# Altium PCB photo_frame-v1.0.PcbDoc (part 4 of 5)
Units mil, origin at the board's own origin, x right, y up, seen from the top; angles counter-clockwise.
Board outline 27716.54 x 14566.93 mil, 2 copper layers (Top Layer, Bottom Layer), stack 61.811 mil thick; 261 components, 231 nets, 1061 pads, 959 vias.
Unrouted connection lines stored in the file: 10.
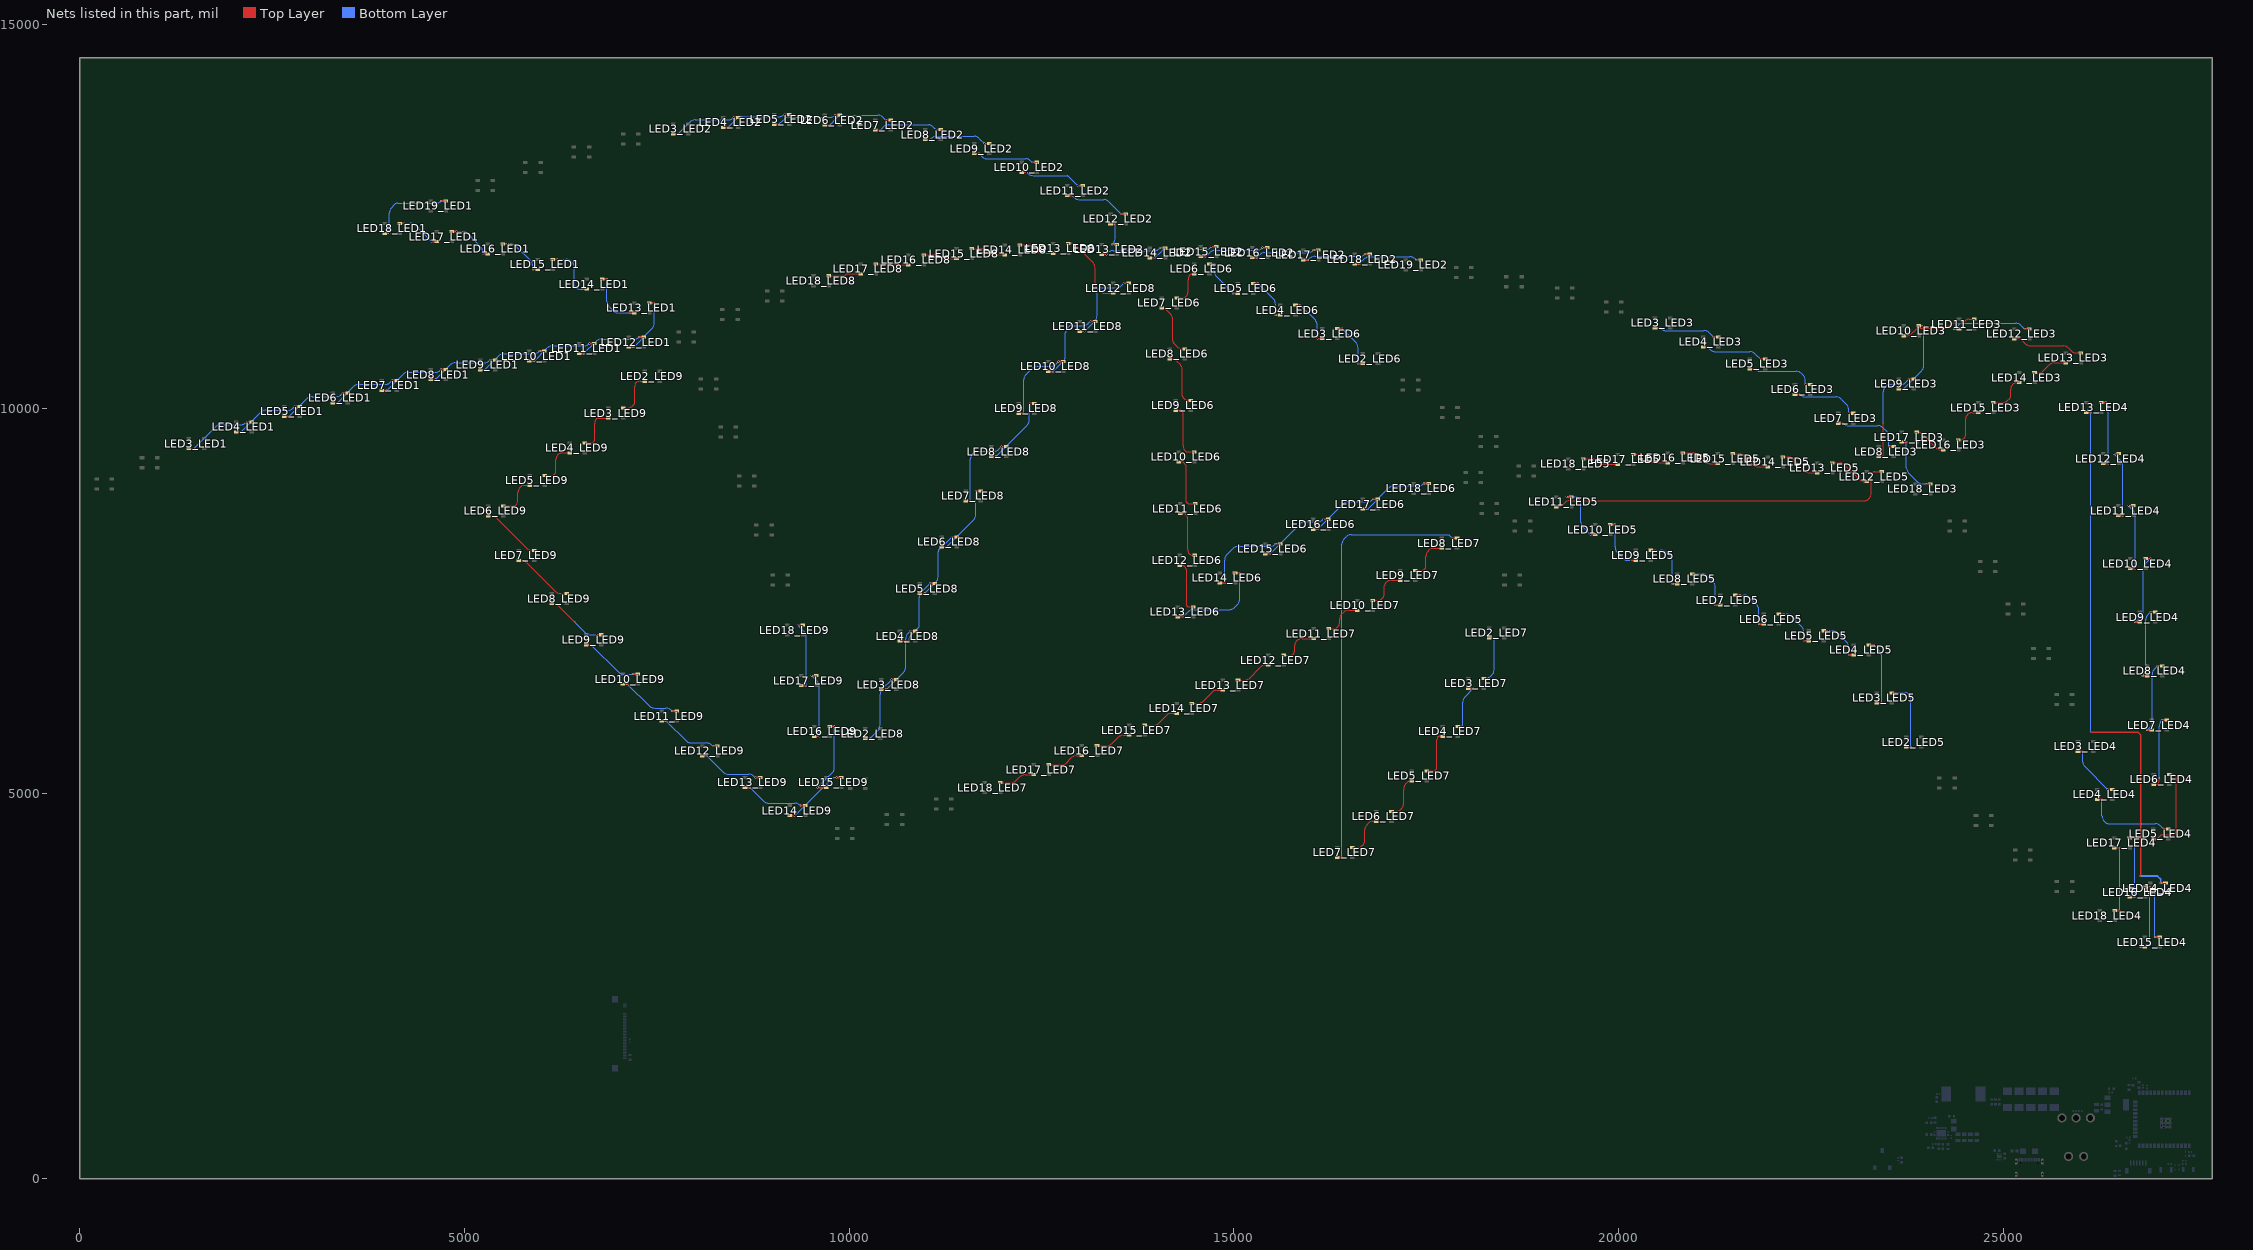
[diagram p3: the nets of this part, all layers, seen from the top]

## Via types
v1: diameter 23.62, hole 11.81, Top Layer to Bottom Layer, tented both sides, 729 vias
v2: diameter 23.62, hole 11.81, Top Layer to Bottom Layer, 230 vias

## Nets (pads, with @x,y where several pads share a name; then routed paths per layer and width w, separated by ;. In a path a pad name is that pad's centre, name@x,y a point inside that pad or via, vN(x,y) a via of type N, cw(c..) or ccw(c..) an arc to the next point about the centre after c; other vN are vias at no path point) (continued)
DOUT2_LED5: LED2_LED5.2 LED3_LED5.4 | length 986.1
  Top Layer w22: LED3_LED5.4@23550.54,6311.22 v1@23613.36,6311.22 ; LED2_LED5.2@23734.69,5606.3 v1@23797.51,5606.3
  Bottom Layer w12: v1(23613.36,6311.35) 23614.27,6312.26 23722.43,6312.26 cw(c23722.43,6229.43) 23729.41,6311.97 cw(c23722.43,6229.43) 23781,6288 cw(c23741.13,6248.13) 23797.51,6248.13 v1(23797.51,5606.43)
DOUT2_LED6: LED2_LED6.2 LED3_LED6.4 | length 662.5
  Top Layer w22: LED3_LED6.4@16343.84,11043.67 v1@16406.66,11043.67 ; v1@16613.2,10588.1 LED2_LED6.2@16676.02,10588.1
  Bottom Layer w12: v1(16406.66,11043.8) 16583.91,10866.56 cw(c16513.2,10795.85) 16613.2,10795.85 v1(16613.2,10588.23)
DOUT2_LED7: LED2_LED7.2 LED3_LED7.4 | length 678.7
  Top Layer w22: LED3_LED7.4@18245.54,6499.22 v1@18308.36,6499.22 ; LED2_LED7.2@18318.69,7026.3 v1@18381.51,7026.3
  Bottom Layer w12: v1(18308.36,6499.09) 18352.22,6542.95 ccw(c18281.51,6613.66) 18381.51,6613.66 v1(18381.51,7026.17)
DOUT2_LED8: LED2_LED8.2 LED3_LED8.4 | length 1001
  Top Layer w22: LED2_LED8.2@10208.69,5716.3 v1@10271.51,5716.3 ; v1@10551.72,6484.22 LED3_LED8.4@10614.54,6484.22
  Bottom Layer w12: v1(10271.51,5716.17) 10372.83,5817.48 ccw(c10302.12,5888.19) 10402.12,5888.19 10402.12,6293.06 cw(c10502.12,6293.06) 10431.41,6363.77 v1(10551.72,6484.09)
DOUT2_LED9: LED2_LED9.2 LED3_LED9.4 | length 558.1
  Top Layer w12: LED3_LED9.4@7066.54,10011.22 7116.8,10011.22 ccw(c7116.8,10111.22) 7142.42,10014.56 ccw(c7116.8,10111.22) 7187.51,10040.51 7201,10054 ccw(c7172.03,10082.97) 7213,10082.97 7213,10287.88 cw(c7313,10287.88) 7222.28,10329.94 7230.28,10337.94 cw(c7284.25,10283.97) 7284.25,10360.3 LED2_LED9.2@7342.69,10360.3
DOUT3_LED1: LED3_LED1.2 LED4_LED1.4 | length 951.9
  Top Layer w22: LED3_LED1.2@1420.08,9484.22 v1@1482.9,9484.22 ; v1@2172.72,9833.22 LED4_LED1.4@2235.54,9833.22
  Bottom Layer w12: v1(1482.9,9484.09) 1764.52,9765.71 cw(c1835.23,9695) 1835.23,9795 2093.21,9795 ccw(c2093.21,9895) 2163.93,9824.29 v1(2172.72,9833.09)
  Bottom Layer w22: v1@1482.08,9484.22 v1@1482.42,9484.56
DOUT3_LED2: LED3_LED2.2 LED4_LED2.4 | length 929.3
  Top Layer w22: LED3_LED2.2@7713.69,13573.3 v1@7776.51,13573.3 ; v1@8499.72,13788.22 LED4_LED2.4@8562.54,13788.22
  Bottom Layer w12: v1(7776.51,13573.17) 7930.32,13726.97 cw(c8001.03,13656.26) 8001.03,13756.26 8426.47,13756.26 ccw(c8426.47,13856.26) 8497.19,13785.55 v1(8499.72,13788.09)
DOUT3_LED3: LED3_LED3.2 LED4_LED3.4 | length 860.7
  Top Layer w22: LED3_LED3.2@20472.69,11053.3 v1@20535.51,11053.3 ; v1@21230.72,10936.22 LED4_LED3.4@21293.54,10936.22
  Bottom Layer w12: v1(20535.51,11053.43) 20540.66,11048.29 ccw(c20611.37,11119) 20611.37,11019 21106.66,11019 cw(c21106.66,10919) 21177.37,10989.71 v1(21230.72,10936.35)
DOUT3_LED4: LED3_LED4.2 LED4_LED4.4 | length 746.9
  Top Layer w22: LED3_LED4.2@25969.05,5550.32 v1@26031.87,5550.32 ; v1@26352.17,5057.42 LED4_LED4.4@26414.99,5057.42
  Bottom Layer w12: v1(26031.87,5550.19) 26031.87,5419 ccw(c26131.87,5419) 26061.16,5348.29 v1(26352.17,5057.28)
DOUT3_LED5: LED3_LED5.2 LED4_LED5.4 | length 917.4
  Top Layer w22: LED4_LED5.4@23249.54,6934.22 v1@23312.36,6934.22 ; LED3_LED5.2@23353.69,6181.3 v1@23416.51,6181.3
  Bottom Layer w12: v1(23312.36,6934.35) 23387.22,6859.49 cw(c23316.51,6788.78) 23416.51,6788.78 v1(23416.51,6181.43)
DOUT3_LED6: LED3_LED6.2 LED4_LED6.4 | length 648.4
  Top Layer w22: LED4_LED6.4@15800.85,11349.47 v1@15863.67,11349.47 ; v1@16084.17,10913.75 LED3_LED6.2@16146.99,10913.75
  Bottom Layer w12: v1(15863.67,11349.6) 16054.88,11158.39 cw(c15984.17,11087.68) 16084.17,11087.68 v1(16084.17,10913.88)
DOUT3_LED7: LED3_LED7.2 LED4_LED7.4 | length 671.2
  Top Layer w22: LED4_LED7.4@17911.54,5876.22 v1@17974.36,5876.22 ; LED3_LED7.2@18048.69,6369.3 v1@18111.51,6369.3
  Bottom Layer w12: v1(17974.36,5876.09) 17974.36,6190.59 cw(c18074.36,6190.59) 18003.65,6261.31 v1(18111.51,6369.17)
DOUT3_LED8: LED3_LED8.2 LED4_LED8.4 | length 1006.8
  Top Layer w22: LED3_LED8.2@10417.69,6354.3 v1@10480.51,6354.3 ; v1@10795.72,7113.22 LED4_LED8.4@10858.54,7113.22
  Bottom Layer w12: v1(10480.51,6354.17) 10707.71,6581.36 ccw(c10637,6652.07) 10725.51,6605.54 ccw(c10637,6652.07) 10737,6652.07 10737,7013.21 cw(c10837,7013.21) 10763.28,7080.78 cw(c10837,7013.21) 10766.29,7083.92 v1(10795.72,7113.35)
DOUT3_LED9: LED3_LED9.2 LED4_LED9.4 | length 582.8
  Top Layer w12: LED4_LED9.4@6565.54,9559.22 6651.56,9559.22 ccw(c6651.56,9599.44) 6680,9571 ccw(c6648.62,9602.38) 6693,9602.38 6693,9808.72 cw(c6793,9808.72) 6711.69,9866.94 cw(c6746.37,9832.26) 6746.37,9881.3 LED3_LED9.2@6869.69,9881.3
DOUT4_LED1: LED4_LED1.2 LED5_LED1.4 | length 949.4
  Top Layer w22: LED4_LED1.2@2038.69,9703.3 v1@2101.51,9703.3 ; v1@2796.72,10034.22 LED5_LED1.4@2859.54,10034.22
  Bottom Layer w12: v1(2101.51,9703.17) 2353.32,9954.97 cw(c2424.03,9884.26) 2424.03,9984.26 2705.47,9984.26 ccw(c2705.47,10084.26) 2773.05,10010.54 ccw(c2705.47,10084.26) 2776.19,10013.55 v1(2796.72,10034.09)
  Bottom Layer w22: v1@2796.66,10034.15 v1@2796.72,10034.22
DOUT4_LED2: LED4_LED2.2 LED5_LED2.4 | length 918.2
  Top Layer w22: LED4_LED2.2@8365.69,13658.3 v1@8428.51,13658.3 ; v1@9158.72,13829.22 LED5_LED2.4@9221.54,13829.22
  Bottom Layer w12: v1(8428.51,13658.17) 8539.32,13768.97 cw(c8610.03,13698.26) 8610.03,13798.26 9086.21,13798.26 ccw(c9086.21,13898.26) 9156.92,13827.55 v1(9158.72,13829.35)
DOUT4_LED3: LED4_LED3.2 LED5_LED3.4 | length 861.5
  Top Layer w22: LED4_LED3.2@21096.69,10806.3 v1@21159.51,10806.3 ; v1@21839.72,10651.22 LED5_LED3.4@21902.54,10651.22
  Bottom Layer w12: v1(21159.51,10806.43) 21193.66,10772.29 ; 21193.69,10772.26 ccw(c21264.37,10843) 21264.37,10743 21706.66,10743 cw(c21706.66,10643) 21777.37,10713.71 v1(21839.72,10651.35)
DOUT4_LED4: LED4_LED4.2 LED5_LED4.4 | length 1222
  Top Layer w22: LED4_LED4.2@26218.14,4927.49 v1@26280.96,4927.49 ; v1@27080.99,4544.3 LED5_LED4.4@27143.81,4544.3
  Bottom Layer w12: v1(26280.96,4927.36) 26280.96,4714.47 ccw(c26380.96,4714.47) 26310.25,4643.75 26325,4629 ccw(c26370.87,4674.87) 26370.87,4610 26973.74,4610 cw(c26973.74,4510) 27044.45,4580.71 v1(27080.99,4544.17)
DOUT4_LED5: LED4_LED5.2 LED5_LED5.4 | length 593.7
  Top Layer w22: LED5_LED5.4@22664.54,7118.22 v1@22727.36,7118.22 ; v1@22989.87,6804.3 LED4_LED5.2@23052.69,6804.3
  Bottom Layer w12: v1(22727.36,7118.35) 22778.22,7118.35 cw(c22778.22,7018.35) 22848.94,7089.06 22960.58,6977.42 cw(c22889.87,6906.71) 22989.87,6906.71 v1(22989.87,6804.43)
DOUT4_LED6: LED4_LED6.2 LED5_LED6.4 | length 628.9
  Top Layer w22: LED5_LED6.4@15249.93,11632.48 v1@15312.75,11632.48 ; v1@15541.18,11219.55 LED4_LED6.2@15604,11219.55
  Bottom Layer w12: v1(15312.75,11632.62) 15511.89,11433.48 cw(c15441.18,11362.77) 15541.18,11362.77 v1(15541.18,11219.68)
DOUT4_LED7: LED4_LED7.2 LED5_LED7.4 | length 621.7
  Top Layer w12: LED5_LED7.4@17508.54,5298.22 17606.88,5298.22 ccw(c17606.88,5311.12) 17616,5302 17619.62,5305.62 ccw(c17575.23,5350) 17638,5350 17638,5702.84 cw(c17699.46,5702.84) 17647.15,5735.11 ; 17646,5734 cw(c17675.69,5704.31) 17647.15,5735.11 ; LED4_LED7.2@17714.69,5746.3 17675.69,5746.3 ccw(c17675.69,5704.31) 17647.15,5735.11
DOUT4_LED8: LED4_LED8.2 LED5_LED8.4 | length 1028.5
  Top Layer w22: LED4_LED8.2@10661.69,6983.3 v1(10773.12,6983.26) ; v1@11050.72,7731.22 LED5_LED8.4@11113.54,7731.22
  Bottom Layer w12: v1(10773.12,6983.26) 10773.12,6986.37 cw(c10873.12,6986.37) 10802.41,7057.08 10912.66,7167.34 10912.66,7551.6 cw(c11012.66,7551.6) 10922.36,7594.57 cw(c11012.66,7551.6) 10941.95,7622.31 v1(11050.72,7731.09)
DOUT4_LED9: LED4_LED9.2 LED5_LED9.4 | length 552.2
  Top Layer w12: LED5_LED9.4@6045.54,9137.22 6127.25,9137.22 ccw(c6127.25,9204.75) 6175,9157 ccw(c6138.79,9193.21) 6190,9193.21 6190,9342.64 cw(c6275.36,9342.64) 6215,9403 cw(c6278.49,9339.51) 6278.49,9429.3 LED4_LED9.2@6368.69,9429.3
DOUT5_LED1: LED5_LED1.2 LED6_LED1.4 | length 942.1
  Top Layer w22: LED5_LED1.2@2662.69,9904.3 v1@2725.51,9904.3 ; v1@3423.72,10210.22 LED6_LED1.4@3486.54,10210.22
  Bottom Layer w12: v1(2725.51,9904.17) 2952.32,10130.97 cw(c3023.03,10060.26) 3023.03,10160.26 3332.47,10160.26 ccw(c3332.47,10260.26) 3400.05,10186.54 ccw(c3332.47,10260.26) 3403.19,10189.55 v1(3423.72,10210.09)
  Bottom Layer w22: v1@3423.66,10210.15 v1@3423.72,10210.22
DOUT5_LED2: LED5_LED2.2 LED6_LED2.4 | length 896.6
  Top Layer w22: LED5_LED2.2@9024.69,13699.3 v1@9087.51,13699.3 ; v1@9816.72,13818.22 LED6_LED2.4@9879.54,13818.22
  Bottom Layer w12: v1(9087.51,13699.17) 9149.32,13760.97 cw(c9220.03,13690.26) 9220.03,13790.26 9757,13790.26 ccw(c9757,13866.62) v1@9810.96,13812.6 ; v1@9810.99,13812.62 v1(9816.72,13818.35)
DOUT5_LED3: LED5_LED3.2 LED6_LED3.4 | length 906.7
  Top Layer w22: LED5_LED3.2@21705.69,10521.3 v1@21768.51,10521.3 ; v1@22425.79,10320.59 LED6_LED3.4@22488.61,10320.59
  Bottom Layer w12: v1(21768.51,10521.43) 21772.4,10517.55 ccw(c21843.11,10588.26) 21843.11,10488.26 22307.32,10488.26 cw(c22307.32,10388.26) 22378.03,10458.97 22400,10437 cw(c22337.73,10374.73) 22425.79,10374.73 v1(22425.79,10320.73)
DOUT5_LED4: LED5_LED4.2 LED6_LED4.4 | length 1147.8
  Top Layer w12: LED5_LED4.2@26946.96,4414.38 26983,4414.38 ccw(c26983,4456) 27012.43,4426.57 27039.32,4453.46 ; 27039.35,4453.49 cw(c27072,4420.79) 27072,4467 27191.37,4467 ccw(c27191.37,4521.63) 27230,4483 ccw(c27188.96,4524.04) 27245.84,4512.52 ccw(c27188.96,4524.04) 27247,4524.04 27247,5199.62 ccw(c27202.62,5199.62) 27234,5231 ccw(c27184.11,5181.11) 27196.88,5250.5 ccw(c27184.11,5181.11) 27184.11,5251.67 LED6_LED4.4@27153.06,5251.67
DOUT5_LED5: LED5_LED5.2 LED6_LED5.4 | length 613.4
  Top Layer w22: LED6_LED5.4@22081.97,7334.26 v1@22144.79,7334.26 ; v1@22404.87,6988.3 LED5_LED5.2@22467.69,6988.3
  Bottom Layer w12: v1(22144.79,7334.39) 22176.19,7334.39 cw(c22176.19,7234.39) 22246.9,7305.1 22375.58,7176.42 cw(c22304.87,7105.71) 22404.87,7105.71 v1(22404.87,6988.43)
DOUT5_LED6: LED5_LED6.2 LED6_LED6.4 | length 604.1
  Top Layer w22: LED6_LED6.4@14683.67,11884.4 v1@14746.49,11884.4 ; v1@14990.26,11502.56 LED5_LED6.2@15053.08,11502.56
  Bottom Layer w12: v1(14746.49,11884.53) 14746.49,11787.89 ccw(c14846.49,11787.89) 14775.78,11717.18 v1(14990.26,11502.69)
DOUT5_LED7: LED5_LED7.2 LED6_LED7.4 | length 566.6
  Top Layer w12: LED6_LED7.4@17048.54,4772.22 17102.8,4772.22 ccw(c17102.8,4872.22) 17107.17,4772.32 ccw(c17102.8,4872.22) 17173.51,4801.51 17176.71,4804.71 ccw(c17106,4875.42) 17206,4875.42 17206,5061.82 cw(c17298.18,5061.82) 17233,5127 17247.86,5141.86 cw(c17311.69,5078.02) LED5_LED7.2@17311.69,5168.3
DOUT5_LED8: LED5_LED8.2 LED6_LED8.4 | length 1006.1
  Top Layer w22: LED5_LED8.2@10916.69,7601.3 v1@10979.51,7601.3 ; v1@11337.72,8339.22 LED6_LED8.4@11400.54,8339.22
  Bottom Layer w12: v1(10979.51,7601.43) 11127.83,7749.75 ccw(c11057.12,7820.46) 11157.12,7820.46 11157.12,8144 cw(c11192.73,8144) 11165.78,8167.28 cw(c11192.73,8144) 11167.54,8169.17 ; 11167.55,8169.18 v1(11337.72,8339.35)
DOUT5_LED9: LED5_LED9.2 LED6_LED9.4 | length 543.9
  Top Layer w12: LED6_LED9.4@5505.54,8740.22 5645.8,8740.22 ccw(c5645.8,8770.2) 5667,8749 5667.71,8749.71 ccw(c5597,8820.42) 5697,8820.42 5697,8911.88 cw(c5797,8911.88) 5726.29,8982.59 5736.86,8993.16 cw(c5771,8959.01) 5771,9007.3 LED5_LED9.2@5848.69,9007.3
DOUT6_LED1: LED6_LED1.2 LED7_LED1.4 | length 947.2
  Top Layer w22: LED6_LED1.2@3289.69,10080.3 v1@3352.51,10080.3 ; v1@4061.72,10370.22 LED7_LED1.4@4124.54,10370.22
  Bottom Layer w12: v1(3352.51,10080.17) 3565.32,10292.97 cw(c3636.03,10222.26) 3636.03,10322.26 3979,10322.26 ccw(c3979,10405.86) 4038.12,10346.75 v1(4061.72,10370.35)
DOUT6_LED2: LED6_LED2.2 LED7_LED2.4 | length 927.7
  Top Layer w22: LED6_LED2.2@9682.69,13688.3 v1@9745.51,13688.3 ; v1@10475.72,13753.22 LED7_LED2.4@10538.54,13753.22
  Bottom Layer w12: v1(9745.51,13688.43) 9845.79,13788.71 cw(c9916.5,13718) 9853.01,13795.26 cw(c9916.5,13718) 9916.5,13818 10369.66,13818 cw(c10369.66,13718) 10433.15,13795.26 cw(c10369.66,13718) 10440.37,13788.71 v1(10475.72,13753.35)
DOUT6_LED3: LED6_LED3.2 LED7_LED3.4 | length 901.3
  Top Layer w22: LED6_LED3.2@22291.76,10190.67 v1@22354.58,10190.67 ; v1@22988.34,9944.43 LED7_LED3.4@23051.16,9944.43
  Bottom Layer w12: v1(22354.58,10190.81) 22359.1,10186.29 ccw(c22429.81,10257) 22429.81,10157 22824.58,10157 cw(c22824.58,10057) 22873.42,10144.26 cw(c22824.58,10057) 22895.29,10127.71 22959.05,10063.95 cw(c22888.34,9993.24) 22988.34,9993.24 v1(22988.34,9944.56)
DOUT6_LED4: LED6_LED4.2 LED7_LED4.4 | length 958.9
  Top Layer w12: LED6_LED4.2@26956.21,5121.75 26979.93,5121.75 ccw(c26979.93,5184.07) 27004.15,5126.64 ccw(c26956.23,5174.57) 27024,5174.57 v1(27024,5204)
  Top Layer w22: v1@27062.15,5957.47 LED7_LED4.4@27124.97,5957.47
  Bottom Layer w12: v1(27024,5204) 27024,5877.77 cw(c27124,5877.77) 27053.29,5948.48 v1(27062.15,5957.34)
DOUT6_LED5: LED6_LED5.2 LED7_LED5.4 | length 647.3
  Top Layer w22: LED7_LED5.4@21515.54,7581.22 v1@21578.36,7581.22 ; v1@21822.3,7204.34 LED6_LED5.2@21885.12,7204.34
  Bottom Layer w12: v1(21578.36,7581.35) 21626.22,7581.35 cw(c21626.22,7481.35) 21696.94,7552.06 21793.01,7455.99 cw(c21722.3,7385.28) 21822.3,7385.28 v1(21822.3,7204.47)
DOUT6_LED6: LED6_LED6.2 LED7_LED6.4 | length 476.7
  Top Layer w12: LED7_LED6.4@14259.76,11442.37 14333,11442.37 ccw(c14333,11498.81) 14372.9,11458.9 14381.25,11467.25 ccw(c14321.5,11527) 14406,11527 14406,11682.05 cw(c14506,11682.05) 14419.63,11732.46 cw(c14472.78,11679.32) 14472.78,11754.48 LED6_LED6.2@14486.82,11754.48
DOUT6_LED7: LED6_LED7.2 LED7_LED7.4 | length 562.4
  Top Layer w12: LED7_LED7.4@16538.54,4304.22 16613.59,4304.22 ccw(c16613.59,4385.41) 16671,4328 16672.71,4329.71 ccw(c16602,4400.42) 16702,4400.42 16702,4529.58 cw(c16802,4529.58) 16731.29,4600.29 16754,4623 cw(c16800.59,4576.41) 16800.59,4642.3 LED6_LED7.2@16851.69,4642.3
DOUT6_LED8: LED6_LED8.2 LED7_LED8.4 | length 1004.2
  Top Layer w22: LED6_LED8.2@11203.69,8209.3 v1@11266.51,8209.3 ; v1@11647.72,8934.22 LED7_LED8.4@11710.54,8934.22
  Bottom Layer w12: v1(11266.51,8209.43) 11618.43,8561.35 ccw(c11547.72,8632.06) 11647.72,8632.06 v1(11647.72,8934.35)
DOUT6_LED9: LED6_LED9.2 LED7_LED9.4 | length 775.3
  Top Layer w12: LED6_LED9.2@5308.69,8610.3 5347.66,8610.3 cw(c5347.66,8510.3) 5418.37,8581.01 5808.87,8190.51 ccw(c5879.58,8261.22) 5879.58,8161.22 LED7_LED9.4@5906.54,8161.22
DOUT7_LED1: LED7_LED1.2 LED8_LED1.4 | length 935.9
  Top Layer w22: LED7_LED1.2@3927.69,10240.3 v1@3990.51,10240.3 ; v1@4696.72,10512.22 LED8_LED1.4@4759.54,10512.22
  Bottom Layer w12: v1(3990.51,10240.17) 4197.32,10446.97 cw(c4268.03,10376.26) 4268.03,10476.26 4619.47,10476.26 ccw(c4619.47,10576.26) 4690.19,10505.55 v1(4696.72,10512.09)
DOUT7_LED2: LED7_LED2.2 LED8_LED2.4 | length 893.8
  Top Layer w22: LED7_LED2.2@10341.69,13623.3 v1@10404.51,13623.3 ; v1@11125.72,13630.22 LED8_LED2.4@11188.54,13630.22
  Bottom Layer w12: v1(10404.51,13623.43) 10443.79,13662.71 cw(c10514.5,13592) 10454.85,13672.26 cw(c10514.5,13592) 10514.5,13692 11038,13692 cw(c11038,13629.04) 11082.52,13673.56 v1(11125.72,13630.35)
DOUT7_LED3: LED7_LED3.2 LED8_LED3.4 | length 930.7
  Top Layer w22: LED7_LED3.2@22854.31,9814.51 v1@22917.13,9814.51 ; v1@23511.69,9511.41 LED8_LED3.4@23574.51,9511.41
  Bottom Layer w12: v1(22917.13,9814.64) 22919.22,9812.55 ccw(c22989.94,9883.26) 22989.94,9783.26 23367,9783.26 cw(c23367,9687.32) 23434.84,9755.16 23482.4,9707.6 cw(c23411.69,9636.89) 23511.69,9636.89 v1(23511.69,9511.54)
DOUT7_LED4: LED7_LED4.2 LED8_LED4.4 | length 1008.4
  Top Layer w22: v1@26865.3,5827.55 LED7_LED4.2@26928.12,5827.55 ; v1@27003.91,6661.54 LED8_LED4.4@27066.73,6661.54
  Bottom Layer w12: v1(26865.3,5827.68) 26902.71,5865.09 ccw(c26832,5935.81) 26932,5935.81 26932,6548.35 cw(c27032,6548.35) 26958.12,6615.74 cw(c27032,6548.35) 26958.28,6615.92 cw(c27032,6548.35) 26961.29,6619.06 v1(27003.91,6661.68)
DOUT7_LED5: LED7_LED5.2 LED8_LED5.4 | length 684.1
  Top Layer w22: LED8_LED5.4@20958.54,7857.22 v1@21021.36,7857.22 ; v1@21255.87,7451.3 LED7_LED5.2@21318.69,7451.3
  Bottom Layer w12: v1(21021.36,7857.35) 21089.22,7857.35 cw(c21089.22,7757.35) 21159.94,7828.06 21226.58,7761.42 cw(c21155.87,7690.71) 21255.87,7690.71 v1(21255.87,7451.43)
DOUT7_LED6: LED7_LED6.2 LED8_LED6.4 | length 705.3
  Top Layer w12: LED7_LED6.2@14062.91,11312.45 cw(c14062.91,11226.42) 14123.75,11287.25 14176.83,11234.17 cw(c14106.12,11163.46) 14206.12,11163.46 14206.12,10890 ccw(c14259.52,10890) 14221.76,10852.24 14274,10800 ccw(c14321.75,10847.75) 14321.75,10780.22 LED8_LED6.4@14363.54,10780.22
DOUT7_LED7: LED7_LED7.2 LED8_LED7.4 | length 5712.8
  Top Layer w22: LED7_LED7.2@16341.69,4174.3 v1@16404.51,4174.3 ; v1@17836.72,8321.22 LED8_LED7.4@17899.54,8321.22
  Bottom Layer w12: v1(16404.51,4174.17) 16404.51,8243.09 cw(c16504.51,8243.09) 16433.8,8313.8 16457.71,8337.71 cw(c16528.42,8267) 16528.42,8367 17790.81,8367 v1(17836.72,8321.09)
DOUT7_LED8: LED7_LED8.2 LED8_LED8.4 | length 1154.7
  Top Layer w22: LED7_LED8.2@11513.69,8804.3 v1@11576.51,8804.3 ; v1@11979.72,9511.22 LED8_LED8.4@12042.54,9511.22
  Bottom Layer w12: v1(11576.51,8804.43) 11576.51,9348.09 cw(c11676.51,9348.09) 11605.8,9418.8 11623,9436 cw(c11661.63,9397.37) 11661.63,9452 11891,9452 ccw(c11891,9522.9) 11941.14,9472.77 v1(11979.72,9511.35)
DOUT7_LED9: LED7_LED9.2 LED8_LED9.4 | length 791
  Top Layer w12: LED7_LED9.2@5709.69,8031.3 5741.66,8031.3 cw(c5741.66,7931.3) 5812.37,8002.01 6182.87,7631.51 ccw(c6253.58,7702.22) 6253.58,7602.22 LED8_LED9.4@6331.54,7602.22
DOUT8_LED1: LED8_LED1.2 LED9_LED1.4 | length 937.1
  Top Layer w22: LED8_LED1.2@4562.69,10382.3 v1@4625.51,10382.3 ; v1@5339.27,10638.9 LED9_LED1.4@5402.09,10638.9
  Bottom Layer w12: v1(4625.51,10382.17) 4815.32,10571.97 cw(c4886.03,10501.26) 4886.03,10601.26 5260.34,10601.26 ccw(c5260.34,10701.26) 5331.05,10630.55 v1(5339.27,10638.76)
DOUT8_LED2: LED8_LED2.2 LED9_LED2.4 | length 880.9
  Top Layer w22: LED8_LED2.2@10991.69,13500.3 v1@11054.51,13500.3 ; v1@11760.72,13448.22 LED9_LED2.4@11823.54,13448.22
  Bottom Layer w12: v1(11054.51,13500.43) 11068.79,13514.71 cw(c11139.5,13444) 11100.93,13536.26 cw(c11139.5,13444) 11139.5,13544 11623.66,13544 cw(c11623.66,13444) 11694.37,13514.71 v1(11760.72,13448.35)
DOUT8_LED3: LED8_LED3.2 LED9_LED3.4 | length 1372.5
  Top Layer w12: LED8_LED3.2@23377.66,9381.49 23408.45,9381.49 ccw(c23408.45,9410.55) 23429,9390 ccw(c23404.57,9414.43) 23439.12,9414.43 v1(23439.12,9819.26)
  Top Layer w22: v1@23774.3,10391.11 LED9_LED3.4@23837.12,10391.11
  Bottom Layer w12: v1(23439.12,9819.26) 23439.12,10223.7 cw(c23539.12,10223.7) 23468.41,10294.41 23481,10307 cw(c23517.21,10270.79) 23517.21,10322 23680,10322 ccw(c23680,10383.13) 23723.23,10339.91 v1(23774.3,10390.98)
DOUT8_LED4: LED8_LED4.2 LED9_LED4.4 | length 993.6
  Top Layer w22: v1@26807.06,6531.62 LED8_LED4.2@26869.88,6531.62 ; v1@26908.59,7361.46 LED9_LED4.4@26971.41,7361.46
  Bottom Layer w12: v1(26807.06,6531.76) 26819.71,6544.41 ccw(c26749,6615.12) 26849,6615.12 26849,6680.41 ccw(c26852.41,6680.41) 26850,6678 26850,7261.59 cw(c26950,7261.59) 26861.12,7307.41 cw(c26950,7261.59) 26879.29,7332.3 v1(26908.59,7361.59)
DOUT8_LED5: LED8_LED5.2 LED9_LED5.4 | length 710.1
  Top Layer w22: LED9_LED5.4@20416.54,8164.22 v1@20479.36,8164.22 ; v1@20698.87,7727.3 LED8_LED5.2@20761.69,7727.3
  Bottom Layer w12: v1(20479.36,8164.35) 20549.22,8164.35 cw(c20549.22,8064.35) 20619.94,8135.06 20669.58,8085.42 cw(c20598.87,8014.71) 20698.87,8014.71 v1(20698.87,7727.43)
DOUT8_LED6: LED8_LED6.2 LED9_LED6.4 | length 712.4
  Top Layer w12: LED8_LED6.2@14166.69,10650.3 14188.09,10650.3 cw(c14188.09,10550.3) 14258.8,10621.01 14301.71,10578.1 cw(c14231,10507.39) 14331,10507.39 14331,10170 ccw(c14364.36,10170) 14340.77,10146.41 14357.39,10129.8 ccw(c14397.5,10169.91) 14397.5,10113.18 LED9_LED6.4@14439.12,10113.18
DOUT8_LED7: LED8_LED7.2 LED9_LED7.4 | length 560.6
  Top Layer w12: LED9_LED7.4@17358.54,7903.22 17437.08,7903.22 ccw(c17437.08,7963.92) 17480,7921 ccw(c17443.79,7957.21) 17495,7957.21 17495,8081.58 cw(c17595,8081.58) 17524.29,8152.29 17541,8169 cw(c17594.83,8115.17) 17594.83,8191.3 LED8_LED7.2@17702.69,8191.3
DOUT8_LED8: LED8_LED8.2 LED9_LED8.4 | length 993.3
  Top Layer w22: LED8_LED8.2@11845.69,9381.3 v1@11908.51,9381.3 ; v1@12340.72,10074.22 LED9_LED8.4@12403.54,10074.22
  Bottom Layer w12: v1(11908.51,9381.43) 12311.43,9784.35 ccw(c12240.72,9855.06) 12340.72,9855.06 v1(12340.72,10074.35)
DOUT8_LED9: LED8_LED9.2 LED9_LED9.4 | length 804.5
  Top Layer w12: LED8_LED9.2@6134.69,7472.3 6151.28,7472.3 cw(c6151.28,7372.3) 6221.99,7443.01 v1(6437.5,7227.5)
  Top Layer w22: v1@6716.72,7066.22 LED9_LED9.4@6779.54,7066.22
  Bottom Layer w12: v1(6437.5,7227.5) 6569.62,7095.38 ccw(c6640.33,7166.09) 6640.33,7066.09 v1(6716.72,7066.09)
DOUT9_LED1: LED9_LED1.2 LED10_LED1.4 | length 928.9
  Top Layer w22: LED9_LED1.2@5205.24,10508.98 v1@5268.06,10508.98 ; v1@5978.72,10753.22 LED10_LED1.4@6041.54,10753.22
  Bottom Layer w12: v1(5268.06,10508.84) 5449.18,10689.97 cw(c5519.89,10619.26) 5519.89,10719.26 5903.47,10719.26 ccw(c5903.47,10819.26) 5974.19,10748.55 v1(5978.72,10753.09)
DOUT9_LED2: LED9_LED2.2 LED10_LED2.4 | length 852.8
  Top Layer w22: LED9_LED2.2@11626.69,13318.3 v1@11689.51,13318.3 ; v1@12378.72,13206.22 LED10_LED2.4@12441.54,13206.22
  Bottom Layer w12: v1(11689.51,13318.43) 11728.4,13279.55 ccw(c11799.11,13350.26) 11799.11,13250.26 12295,13250.26 cw(c12295,13154.13) 12362.97,13222.1 v1(12378.72,13206.35)
DOUT9_LED3: LED9_LED3.2 LED10_LED3.4 | length 1049.7
  Top Layer w22: LED9_LED3.2@23640.27,10261.19 v1@23703.09,10261.19 ; LED10_LED3.4@23900.73,11081.68 v1@23963.55,11081.68
  Bottom Layer w12: v1(23703.09,10261.06) 23934.26,10492.23 ccw(c23863.55,10562.94) 23963.55,10562.94 v1(23963.55,11081.54)
DOUT9_LED4: LED9_LED4.2 LED10_LED4.4 | length 1024.2
  Top Layer w22: v1@26711.74,7231.54 LED9_LED4.2@26774.56,7231.54 ; LED10_LED4.4@26847.18,8055.35 v1@26910,8055.35
  Bottom Layer w12: v1(26711.74,7231.67) 26796.93,7316.87 ccw(c26745.79,7368.02) 26818.12,7368.02 26818.12,7922.18 cw(c26918.12,7922.18) 26847.41,7992.89 v1(26910,8055.49)
DOUT9_LED5: LED9_LED5.2 LED10_LED5.4 | length 709.2
  Top Layer w22: LED10_LED5.4@19890.54,8498.22 v1@19953.36,8498.22 ; v1@20156.87,8034.3 LED9_LED5.2@20219.69,8034.3
  Bottom Layer w12: v1(19953.36,8498.35) 19953.36,8207.06 ccw(c20053.36,8207.06) 19982.65,8136.35 20066,8053 ccw(c20110.83,8097.83) 20110.83,8034.43 v1(20156.87,8034.43)
DOUT9_LED6: LED9_LED6.2 LED10_LED6.4 | length 731.4
  Top Layer w12: LED9_LED6.2@14242.27,9983.26 14294.37,9983.26 cw(c14294.37,9937.45) 14326.76,9969.84 cw(c14294.37,9937.45) 14340.18,9937.45 14340.18,9524.62 ccw(c14440.18,9524.62) 14369.47,9453.91 ccw(c14395.28,9479.72) 14395.28,9443.22 LED10_LED6.4@14482.54,9443.22
DOUT9_LED7: LED9_LED7.2 LED10_LED7.4 | length 545.3
  Top Layer w12: LED10_LED7.4@16802.54,7513.22 16874.25,7513.22 ccw(c16874.25,7580.75) 16922,7533 16927.71,7538.71 ccw(c16857,7609.42) 16957,7609.42 16957,7700.54 cw(c17018.46,7700.54) 16975,7744 cw(c17045.72,7673.3) 17045.72,7773.3 LED9_LED7.2@17161.69,7773.3
DOUT9_LED8: LED9_LED8.2 LED10_LED8.4 | length 1121.4
  Top Layer w22: LED9_LED8.2@12206.69,9944.3 v1@12269.51,9944.3 ; v1@12721.72,10617.22 LED10_LED8.4@12784.54,10617.22
  Bottom Layer w12: v1(12269.51,9944.43) 12269.51,10377.09 cw(c12369.51,10377.09) 12298.8,10447.8 12374.97,10523.97 cw(c12445.68,10453.26) 12445.68,10553.26 12616.21,10553.26 ccw(c12616.21,10653.26) 12686.92,10582.55 v1(12721.72,10617.35)
DOUT9_LED9: LED9_LED9.2 LED10_LED9.4 | length 825.4
  Top Layer w22: LED9_LED9.2@6582.69,6936.3 v1@6645.51,6936.3 ; v1@7191.72,6555.22 LED10_LED9.4@7254.54,6555.22
  Bottom Layer w12: v1(6645.51,6936.17) 6997.3,6584.38 ccw(c7068.01,6655.09) 7067.87,6555.09 ccw(c7068.01,6655.09) 7068.01,6555.09 v1(7191.72,6555.09)
DOUT10_LED1: LED10_LED1.2 LED11_LED1.4 | length 928.7
  Top Layer w22: LED10_LED1.2@5844.69,10623.3 v1@5907.51,10623.3 ; v1@6624.72,10851.22 LED11_LED1.4@6687.54,10851.22
  Bottom Layer w12: v1(5907.51,10623.17) 6074.32,10789.97 cw(c6145.03,10719.26) 6145.03,10819.26 6551.47,10819.26 ccw(c6551.47,10919.26) 6622.19,10848.55 v1(6624.72,10851.09)
DOUT10_LED2: LED10_LED2.2 LED11_LED2.4 | length 857.3
  Top Layer w22: LED10_LED2.2@12244.69,13076.3 v1@12307.51,13076.3 ; v1@12971.72,12902.22 LED11_LED2.4@13034.54,12902.22
  Bottom Layer w12: v1(12307.51,13076.43) 12320.66,13063.29 ccw(c12391.37,13134) 12391.37,13034 12837,13034 cw(c12837,13026.57) 12842.25,13031.82 v1(12971.72,12902.35)
DOUT10_LED3: LED10_LED3.2 LED11_LED3.4 | length 981.2
  Top Layer w12: LED10_LED3.2@23703.88,10951.75 23737.33,10951.75 ccw(c23737.33,11051.75) 23808.04,10981.04 23845.71,11018.71 cw(c23916.42,10948) 23916.42,11048 24221.58,11048 ccw(c24221.58,11148) 24292.29,11077.29 24300.71,11085.71 cw(c24371.42,11015) 24371.42,11115 24434.44,11115 ccw(c24434.44,11215) 24505.15,11144.29 24511.54,11150.68 cw(c24553.6,11108.62) 24553.6,11168.1 LED11_LED3.4@24619.53,11168.1
DOUT10_LED4: LED10_LED4.2 LED11_LED4.4 | length 976.3
  Top Layer w22: v1@26623.72,8743.34 LED11_LED4.4@26686.54,8743.34 ; LED10_LED4.2@26650.33,7925.43 v1@26713.15,7925.43
  Bottom Layer w12: v1(26623.72,8743.47) 26683.86,8683.33 ; 26683.86,8683.33 cw(c26613.15,8612.62) 26686.86,8680.2 cw(c26613.15,8612.62) 26713.15,8612.62 v1(26713.15,7925.56)
DOUT10_LED5: LED10_LED5.2 LED11_LED5.4 | length 818.3
  Top Layer w22: v1@19320.72,8859.22 LED11_LED5.4@19383.54,8859.22 ; v1@19630.87,8368.3 LED10_LED5.2@19693.69,8368.3
  Bottom Layer w12: v1(19320.72,8859.35) 19453.02,8859.35 19509.12,8803.26 19509.12,8531 ccw(c19607.65,8531) 19537.98,8461.33 v1(19630.87,8368.43)
DOUT10_LED6: LED10_LED6.2 LED11_LED6.4 | length 710.4
  Top Layer w12: LED10_LED6.2@14285.69,9313.3 14304.75,9313.3 cw(c14304.75,9233.75) 14361,9290 cw(c14308.25,9237.25) 14382.85,9237.25 14382.85,8795.44 ccw(c14400.44,8795.44) 14388,8783 ccw(c14416.44,8811.44) 14416.44,8771.22 LED11_LED6.4@14499.54,8771.22
DOUT10_LED7: LED10_LED7.2 LED11_LED7.4 | length 525.9
  Top Layer w12: LED11_LED7.4@16232.54,7145.22 16295.59,7145.22 ccw(c16295.59,7226.41) 16311.69,7146.83 ccw(c16295.59,7226.41) 16353,7169 ccw(c16304.72,7217.28) 16373,7217.28 16373,7265.99 cw(c16472.01,7265.99) 16402,7336 16420.01,7354.01 cw(c16490.72,7283.3) 16490.72,7383.3 LED10_LED7.2@16605.69,7383.3
DOUT10_LED8: LED10_LED8.2 LED11_LED8.4 | length 1086
  Top Layer w22: LED10_LED8.2@12587.69,10487.3 v1@12650.51,10487.3 ; v1@13133.72,11138.22 LED11_LED8.4@13196.54,11138.22
  Bottom Layer w12: v1(12650.51,10487.17) 12782.83,10619.48 ccw(c12712.12,10690.19) 12812.12,10690.19 12812.12,10988.7 cw(c12912.12,10988.7) 12841.41,11059.41 12846,11064 cw(c12894.28,11015.72) 12894.28,11084 13038.21,11084 ccw(c13038.21,11184) 13101.12,11106.26 ccw(c13038.21,11184) 13108.93,11113.29 v1(13133.72,11138.09)
DOUT10_LED9: LED10_LED9.2 LED11_LED9.4 | length 839.7
  Top Layer w22: LED10_LED9.2@7057.69,6425.3 v1@7120.51,6425.3 ; v1@7697.72,6074.22 LED11_LED9.4@7760.54,6074.22
  Bottom Layer w12: v1(7120.51,6425.17) 7402.39,6143.29 ccw(c7473.1,6214) 7473.1,6114 7616.39,6114 cw(c7616.39,6014) 7687.1,6084.71 v1(7697.72,6074.09)
DOUT11_LED1: LED11_LED1.2 LED12_LED1.4 | length 923.1
  Top Layer w22: LED11_LED1.2@6490.69,10721.3 v1@6553.51,10721.3 ; v1@7271.02,10935.01 LED12_LED1.4@7333.84,10935.01
  Bottom Layer w12: v1(6553.51,10721.17) 6708.32,10875.97 cw(c6779.03,10805.26) 6779.03,10905.26 7199.98,10905.26 ccw(c7199.98,11005.26) 7270.69,10934.55 v1(7271.02,10934.88)
DOUT11_LED2: LED11_LED2.2 LED12_LED2.4 | length 846.7
  Top Layer w22: LED11_LED2.2@12837.69,12772.3 v1@12900.51,12772.3 ; v1@13530.72,12534.22 LED12_LED2.4@13593.54,12534.22
  Bottom Layer w12: v1(12900.51,12772.43) 12922.66,12750.29 ccw(c12993.37,12821) 12993.37,12721 13311,12721 cw(c13311,12641.14) 13367.47,12697.61 v1(13530.72,12534.35)
DOUT11_LED3: LED11_LED3.2 LED12_LED3.4 | length 1090.7
  Top Layer w22: v1@24359.86,11038.18 LED11_LED3.2@24422.68,11038.18 ; v1@25273.83,11041.92 LED12_LED3.4@25336.65,11041.92
  Bottom Layer w12: v1(24359.86,11038.05) 24404.52,11082.71 cw(c24475.23,11012) 24475.23,11112 25162.19,11112 cw(c25162.19,11012) 25232.91,11082.71 v1(25273.83,11041.79)
DOUT11_LED4: LED11_LED4.2 LED12_LED4.4 | length 976
  Top Layer w22: v1@26433.41,9418.78 LED12_LED4.4@26496.23,9418.78 ; LED11_LED4.2@26489.69,8613.42 v1@26552.51,8613.42
  Bottom Layer w12: v1(26433.41,9418.92) 26523.22,9329.11 cw(c26452.51,9258.4) 26552.51,9258.4 v1(26552.51,8613.55)
DOUT11_LED5: LED11_LED5.2 LED12_LED5.4 | length 4569.6
  Top Layer w12: LED11_LED5.2@19186.69,8729.3 19201.21,8729.3 ccw(c19201.21,8829.3) 19265.9,8753.04 ccw(c19201.21,8829.3) 19271.92,8758.59 19297.59,8784.26 cw(c19362.28,8708) 19362.28,8808 23192.64,8808 ccw(c23192.64,8893.36) 23253,8833 ccw(c23182.99,8903.01) 23282,8903.01 23282,9123.3 cw(c23353.7,9123.3) 23303,9174 cw(c23330.18,9146.82) 23330.18,9185.26 LED12_LED5.4@23418.12,9185.26
DOUT11_LED6: LED11_LED6.2 LED12_LED6.4 | length 689.7
  Top Layer w12: LED11_LED6.2@14302.69,8641.3 14329.37,8641.3 cw(c14329.37,8553.71) 14391.31,8615.65 ; 14378,8625 cw(c14322.19,8569.19) 14401.12,8569.19 14401.12,8174.68 ccw(c14501.12,8174.68) 14414.45,8124.8 ccw(c14476.11,8186.46) 14476.11,8099.26 LED12_LED6.4@14493.12,8099.26
DOUT11_LED7: LED11_LED7.2 LED12_LED7.4 | length 541.3
  Top Layer w12: LED12_LED7.4@15645.54,6802.22 15747.39,6802.22 ccw(c15747.39,6835.61) 15771,6812 ccw(c15729.96,6853.04) 15788,6853.04 15788,6920.23 cw(c15876.77,6920.23) 15814,6983 15817.01,6986.01 cw(c15887.72,6915.3) 15887.72,7015.3 LED11_LED7.2@16035.69,7015.3
DOUT11_LED8: LED11_LED8.2 LED12_LED8.4 | length 1097.9
  Top Layer w22: LED11_LED8.2@12999.69,11008.3 v1@13062.51,11008.3 ; v1@13568.72,11634.22 LED12_LED8.4@13631.54,11634.22
  Bottom Layer w12: v1(13062.51,11008.17) 13192.71,11138.36 ccw(c13122,11209.07) 13208.12,11158.24 ccw(c13122,11209.07) 13222,11209.07 13222,11531 cw(c13238.9,11531) 13226.94,11542.94 13251,11567 cw(c13265.49,11552.51) 13265.49,11573 13466.21,11573 ccw(c13466.21,11673) 13529.12,11595.26 ccw(c13466.21,11673) 13533.79,11599.28 ccw(c13466.21,11673) 13536.93,11602.29 v1(13568.72,11634.09)
  Bottom Layer w22: v1@13568.66,11634.15 v1@13568.72,11634.22
DOUT11_LED9: LED11_LED9.2 LED12_LED9.4 | length 847.2
  Top Layer w22: LED11_LED9.2@7563.69,5944.3 v1@7626.51,5944.3 ; v1@8223.72,5623.22 LED12_LED9.4@8286.54,5623.22
  Bottom Layer w12: v1(7626.51,5944.17) 7881.39,5689.29 ccw(c7952.1,5760) 7952.1,5660 8145.39,5660 cw(c8145.39,5560) 8216.1,5630.71 v1(8223.72,5623.09)
DOUT12_LED1: LED12_LED1.2 LED13_LED1.4 | length 805.1
  Top Layer w22: LED12_LED1.2@7136.99,10805.09 v1@7199.81,10805.09 ; LED13_LED1.4@7404.19,11377.91 v1@7467.01,11377.91
  Bottom Layer w12: v1(7199.81,10804.96) 7437.72,11042.87 ccw(c7367.01,11113.58) 7467.01,11113.58 v1(7467.01,11378.04)
DOUT12_LED2: LED12_LED2.2 LED13_LED2.4 | length 404.6
  Top Layer w22: LED12_LED2.2@13396.69,12404.3 v1@13459.51,12404.3 ; v1@13415.72,12139.22 LED13_LED2.4@13478.54,12139.22
  Bottom Layer w12: v1(13415.72,12139.35) 13430.22,12153.85 ccw(c13359.51,12224.57) 13459.51,12224.57 v1(13459.51,12404.43)
DOUT12_LED3: LED12_LED3.2 LED13_LED3.4 | length 925.5
  Top Layer w12: LED12_LED3.2@25139.8,10912 25180.58,10912 cw(c25180.58,10812) 25251.29,10882.71 25284.71,10849.29 ccw(c25355.42,10920) 25355.42,10820 25776.58,10820 cw(c25776.58,10720) 25847.29,10790.71 25895,10743 ccw(c25928.47,10776.47) 25928.47,10729.14 LED13_LED3.4@26004.54,10729.14
DOUT12_LED4: LED12_LED4.2 LED13_LED4.4 | length 929
  Top Layer w22: LED13_LED4.4@26270.82,10084.56 v1@26333.64,10084.56 ; LED12_LED4.2@26299.38,9288.86 v1@26362.2,9288.86
  Bottom Layer w12: v1(26333.64,10084.69) cw(c26264.7,10015.75) 26362.2,10015.75 v1(26362.2,9289)
DOUT12_LED5: LED12_LED5.2 LED13_LED5.4 | length 536.2
  Top Layer w12: LED13_LED5.4@22777.82,9300.01 22870.57,9300.01 cw(c22870.57,9200.01) 22941.28,9270.72 23127.37,9084.63 ccw(c23198.08,9155.34) 23198.08,9055.34 LED12_LED5.2@23221.27,9055.34
DOUT12_LED6: LED12_LED6.2 LED13_LED6.4 | length 673.3
  Top Layer w12: LED12_LED6.2@14296.27,7969.34 14309.24,7969.34 cw(c14309.24,7886.24) 14368,7945 cw(c14326.67,7903.67) 14385.12,7903.67 14385.12,7451.2 ccw(c14405.2,7451.2) 14391,7437 ccw(c14412.2,7458.2) 14412.2,7428.22 LED13_LED6.4@14469.54,7428.22
DOUT12_LED7: LED12_LED7.2 LED13_LED7.4 | length 467
  Top Layer w12: LED13_LED7.4@15053.97,6478.18 15144.67,6478.18 ccw(c15144.67,6566.33) 15207,6504 15346.01,6643.01 cw(c15416.72,6572.3) 15416.72,6672.3 LED12_LED7.2@15448.69,6672.3
DOUT12_LED8: LED12_LED8.2 LED13_LED8.4 | length 1003.5
  Top Layer w12: LED13_LED8.4@12850.12,12152.26 12880.32,12152.26 cw(c12880.32,12052.26) 12930.79,12138.59 cw(c12880.32,12052.26) 12951.03,12122.97 13166.71,11907.29 cw(c13096,11836.58) 13196,11836.58 13196,11631 ccw(c13290.15,11631) 13223.58,11564.42 13254.41,11533.59 ccw(c13325.12,11604.3) 13325.12,11504.3 LED12_LED8.2@13434.69,11504.3
DOUT12_LED9: LED12_LED9.2 LED13_LED9.4 | length 862.7
  Top Layer w22: LED12_LED9.2@8089.69,5493.3 v1@8152.51,5493.3 ; v1@8781.72,5212.22 LED13_LED9.4@8844.54,5212.22
  Bottom Layer w12: v1(8152.51,5493.17) 8363.39,5282.29 ccw(c8434.1,5353) 8434.1,5253 8699.39,5253 cw(c8699.39,5153) 8770.1,5223.71 v1(8781.72,5212.09)
DOUT13_LED1: LED13_LED1.2 LED14_LED1.4 | length 784.3
  Top Layer w22: LED14_LED1.4@6789.67,11687.93 v1@6852.49,11687.93 ; v1@7144.52,11247.98 LED13_LED1.2@7207.34,11247.98
  Bottom Layer w12: v1(6852.49,11688.06) 6852.49,11399.93 ccw(c6952.49,11399.93) 6881.78,11329.22 6933.59,11277.41 ccw(c7004.3,11348.12) 7004.3,11248.12 v1(7144.52,11248.12)
DOUT13_LED2: LED13_LED2.2 LED14_LED2.4 | length 849.6
  Top Layer w22: LED13_LED2.2@13281.69,12009.3 v1@13344.51,12009.3 ; v1@14042.3,12093.18 LED14_LED2.4@14105.12,12093.18
  Bottom Layer w12: v1(13344.51,12009.43) 13363.05,12027.97 cw(c13433.76,11957.26) 13433.76,12057.26 13964.82,12057.26 ccw(c13964.82,12157.26) 14035.53,12086.55 v1(14042.3,12093.31)
DOUT13_LED3: LED13_LED3.2 LED14_LED3.4 | length 449.8
  Top Layer w12: LED14_LED3.4@25403.99,10471.21 25467.05,10471.21 ccw(c25467.05,10531.95) 25510,10489 25590.93,10569.93 cw(c25661.64,10499.22) 25661.64,10599.22 LED13_LED3.2@25807.69,10599.22
DOUT13_LED4: LED13_LED4.2 LED14_LED4.4 | length 7102.7
  Top Layer w22: LED13_LED4.2@26073.97,9954.64 v1@26136.79,9954.64 ; v1(26137.12,5799.26) 26748.12,5799.26 26783.12,5764.26 v1(26783.12,3930.26) ; v1@27043.14,3839.78 LED14_LED4.4@27105.96,3839.78
  Bottom Layer w12: v1(26136.79,9954.77) 26136.79,5799.59 v1(26137.12,5799.26)
  Bottom Layer w22: v1(26783.12,3930.26) 27003.12,3930.26 27043.14,3890.24 v1(27043.14,3839.91)
DOUT13_LED5: LED13_LED5.2 LED14_LED5.4 | length 527.1
  Top Layer w12: LED14_LED5.4@22131.8,9379.01 22196.57,9379.01 cw(c22196.57,9279.01) 22267.28,9349.72 22417.62,9199.38 ccw(c22488.33,9270.09) 22481.02,9170.35 ccw(c22488.33,9270.09) 22488.33,9170.09 LED13_LED5.2@22580.97,9170.09
DOUT13_LED6: LED13_LED6.2 LED14_LED6.4 | length 1311.2
  Top Layer w22: LED13_LED6.2@14272.69,7298.3 v1@14335.51,7298.3 ; LED14_LED6.4@15014.54,7869.22 v1@15077.36,7869.22
  Bottom Layer w12: v1(14335.51,7298.17) 14398.32,7360.97 cw(c14469.03,7290.26) 14469.03,7390.26 14932.84,7390.26 ccw(c14932.84,7490.26) 15003.55,7419.55 15048.07,7464.07 ccw(c14977.36,7534.78) 15077.36,7534.78 v1(15077.36,7869.09)
DOUT13_LED7: LED13_LED7.2 LED14_LED7.4 | length 466.1
  Top Layer w12: LED14_LED7.4@14454.54,6174.22 14529.8,6174.22 ccw(c14529.8,6274.22) 14600.51,6203.51 14715.97,6318.97 cw(c14786.68,6248.26) 14786.68,6348.26 LED13_LED7.2@14857.12,6348.26
DOUT13_LED8: LED13_LED8.2 LED14_LED8.4 | length 470.4
  Top Layer w12: LED14_LED8.4@12220.54,12133.22 12316.36,12133.22 cw(c12316.36,12033.22) 12387.07,12103.93 12442,12049 ccw(c12506.37,12113.37) 12498.72,12022.66 ccw(c12506.37,12113.37) 12506.37,12022.34 LED13_LED8.2@12653.27,12022.34
DOUT13_LED9: LED13_LED9.2 LED14_LED9.4 | length 869
  Top Layer w22: LED13_LED9.2@8647.69,5082.3 v1@8710.51,5082.3 ; v1@9364.72,4846.22 LED14_LED9.4@9427.54,4846.22
  Bottom Layer w12: v1(8710.51,5082.17) 8885.39,4907.29 ccw(c8956.1,4978) 8956.1,4878 9291.39,4878 cw(c9291.39,4778) 9362.1,4848.71 v1(9364.72,4846.09)
DOUT14_LED1: LED14_LED1.2 LED15_LED1.4 | length 756.2
  Top Layer w22: LED15_LED1.4@6151.93,11944.12 v1@6214.76,11944.12 ; v1@6530,11558.01 LED14_LED1.2@6592.82,11558.01
  Bottom Layer w12: v1(6214.76,11943.99) 6326.59,11943.99 cw(c6326.59,11843.99) 6397.3,11914.7 6408,11904 cw(c6359.72,11855.72) 6428,11855.72 6428,11608.31 ccw(c6455.31,11608.31) 6435.99,11589.01 ; 6436,11589 6437.83,11587.17 ccw(c6508.54,11657.88) 6508.54,11557.88 v1(6530,11557.88)
DOUT14_LED2: LED14_LED2.2 LED15_LED2.4 | length 914.3
  Top Layer w22: LED14_LED2.2@13908.27,11963.26 v1@13971.09,11963.26 ; v1@14706.69,12108.72 LED15_LED2.4@14769.51,12108.72
  Bottom Layer w12: v1(13971.09,11963.39) 14053.67,12045.97 cw(c14124.38,11975.26) 14124.38,12075.26 14645,12075.26 ccw(c14645,12143.1) 14692.97,12095.13 v1(14706.69,12108.85)
DOUT14_LED3: LED14_LED3.2 LED15_LED3.4 | length 518.2
  Top Layer w12: LED15_LED3.4@24868.1,10083.2 24987.78,10083.2 ccw(c24987.78,10183.2) 25058.49,10112.49 25080,10134 ccw(c25048.62,10165.38) 25093,10165.38 25093,10250.72 cw(c25193,10250.72) 25112.12,10309.53 cw(c25193,10250.72) 25122.29,10321.43 25127.13,10326.27 cw(c25163.38,10290.03) 25163.38,10341.29 LED14_LED3.2@25207.14,10341.29
DOUT14_LED4: LED14_LED4.2 LED15_LED4.4 | length 692.9
  Top Layer w22: LED14_LED4.2@26909.11,3709.85 v1(26967.72,3709.85) ; v1@26967.72,3138.22 LED15_LED4.4@27030.54,3138.22
  Bottom Layer w12: v1(26967.72,3138.35) v1(26967.72,3709.85)
DOUT14_LED5: LED14_LED5.2 LED15_LED5.4 | length 513.8
  Top Layer w12: LED15_LED5.4@21483.86,9421.22 21556.36,9421.22 cw(c21556.36,9321.22) 21627.07,9391.93 21740.62,9278.38 ccw(c21811.33,9349.09) 21801.84,9249.54 ccw(c21811.33,9349.09) 21811.33,9249.09 LED14_LED5.2@21934.95,9249.09
DOUT14_LED6: LED14_LED6.2 LED15_LED6.4 | length 1183.7
  Top Layer w22: LED14_LED6.2@14817.69,7739.3 v1@14880.51,7739.3 ; v1@15541.72,8248.22 LED15_LED6.4@15604.54,8248.22
  Bottom Layer w12: v1(14880.51,7739.17) 14880.51,8037.09 cw(c14980.51,8037.09) 14909.8,8107.8 14987,8185 cw(c15055.23,8116.77) 15055.23,8213.26 15465.47,8213.26 ccw(c15465.47,8313.26) 15536.19,8242.55 v1(15541.72,8248.09)
DOUT14_LED7: LED14_LED7.2 LED15_LED7.4 | length 474.1
  Top Layer w12: LED15_LED7.4@13839.54,5892.22 13969.66,5892.22 ccw(c13969.66,5956.34) 14015,5911 14119.01,6015.01 cw(c14189.72,5944.3) 14189.72,6044.3 LED14_LED7.2@14257.69,6044.3
DOUT14_LED8: LED14_LED8.2 LED15_LED8.4 | length 456.1
  Top Layer w12: LED15_LED8.4@11592.54,12084.22 11698.36,12084.22 cw(c11698.36,11984.22) 11769.07,12054.93 11791.41,12032.59 ccw(c11862.12,12103.3) 11862.12,12003.3 LED14_LED8.2@12023.69,12003.3
DOUT14_LED9: LED14_LED9.2 LED15_LED9.4 | length 868.4
  Top Layer w22: LED14_LED9.2@9230.69,4716.3 v1@9293.51,4716.3 ; v1@9835.38,5211.73 LED15_LED9.4@9898.2,5211.73
  Bottom Layer w12: v1(9293.51,4716.17) 9759.65,5182.3 cw(c9830.36,5111.59) 9830.36,5211.59 v1(9835.38,5211.59)
DOUT15_LED1: LED15_LED1.2 LED16_LED1.4 | length 633.1
  Top Layer w22: LED16_LED1.4@5498.65,12146.73 v1@5561.47,12146.73 ; v1@5892.26,11814.2 LED15_LED1.2@5955.08,11814.2
  Bottom Layer w12: v1(5561.47,12146.6) 5599.98,12146.6 cw(c5599.98,12046.6) 5670.69,12117.31 5862.98,11925.02 cw(c5792.26,11854.31) 5892.26,11854.31 v1(5892.26,11814.34)
DOUT15_LED2: LED15_LED2.2 LED16_LED2.4 | length 903.6
  Top Layer w22: LED15_LED2.2@14572.66,11978.8 v1@14635.48,11978.8 ; v1@15373.43,12096.23 LED16_LED2.4@15436.25,12096.23
  Bottom Layer w12: v1(14635.48,11978.93) 14690.52,12033.97 cw(c14761.23,11963.26) 14761.23,12063.26 15298.91,12063.26 ccw(c15298.91,12163.26) 15369.62,12092.55 v1(15373.43,12096.36)
DOUT15_LED3: LED15_LED3.2 LED16_LED3.4 | length 546.5
  Top Layer w12: LED16_LED3.4@24413.13,9598.12 24434.76,9598.12 ccw(c24434.76,9676.24) 24490,9621 ccw(c24444.13,9666.87) 24509,9666.87 24509,9870.06 cw(c24590.94,9870.06) 24533,9928 cw(c24594.02,9866.98) 24589.23,9953.14 cw(c24594.02,9866.98) 24594.02,9953.28 LED15_LED3.2@24671.25,9953.28
DOUT15_LED4: LED15_LED4.2 LED16_LED4.4 | length 1006
  Top Layer w22: v1@26770.87,3008.3 LED15_LED4.2@26833.69,3008.3 ; LED16_LED4.4@26841.47,3786.99 v1@26904.29,3786.99
  Bottom Layer w12: v1(26770.87,3008.43) 26829.93,3008.43 ccw(c26829.93,3082.07) 26882,3030 26884.7,3032.7 ccw(c26837.4,3080) 26904.29,3080 v1(26904.29,3787.13)
DOUT15_LED5: LED15_LED5.2 LED16_LED5.4 | length 501
  Top Layer w12: LED16_LED5.4@20835.19,9430.82 20954.76,9430.82 cw(c20954.76,9330.82) 21025.47,9401.53 21106.41,9320.59 ccw(c21177.12,9391.3) 21160.72,9292.65 ccw(c21177.12,9391.3) 21177.12,9291.3 LED15_LED5.2@21287.01,9291.3
DOUT15_LED6: LED15_LED6.2 LED16_LED6.4 | length 995.3
  Top Layer w22: LED15_LED6.2@15407.69,8118.3 v1@15470.51,8118.3 ; v1@16162.72,8567.22 LED16_LED6.4@16225.54,8567.22
  Bottom Layer w12: v1(15470.51,8118.17) 15855.32,8502.97 cw(c15926.03,8432.26) 15926.03,8532.26 16086.47,8532.26 ccw(c16086.47,8632.26) 16154.05,8558.54 ccw(c16086.47,8632.26) 16157.19,8561.55 v1(16162.72,8567.09)
  Bottom Layer w22: v1@16162.66,8567.15 v1@16162.72,8567.22
DOUT15_LED7: LED15_LED7.2 LED16_LED7.4 | length 469.7
  Top Layer w12: LED16_LED7.4@13221.54,5624.22 13346.8,5624.22 ccw(c13346.8,5724.22) 13417.51,5653.51 13497.01,5733.01 cw(c13567.72,5662.3) 13567.72,5762.3 LED15_LED7.2@13642.69,5762.3
DOUT15_LED8: LED15_LED8.2 LED16_LED8.4 | length 440.5
  Top Layer w12: LED16_LED8.4@10967.97,12002.18 11108.21,12002.18 cw(c11108.21,11916.21) 11169,11977 ccw(c11223.8,12031.8) 11223.8,11954.3 LED15_LED8.2@11395.69,11954.3
DOUT15_LED9: LED15_LED9.2 LED16_LED9.4 | length 1054
  Top Layer w22: v1(9590.66,5081.81) LED15_LED9.2@9701.35,5081.81 ; LED16_LED9.4@9746.83,5875.91 v1@9809.65,5875.91
  Bottom Layer w12: v1(9590.66,5081.81) 9780.36,5271.5 ccw(c9709.65,5342.21) 9809.65,5342.21 v1(9809.65,5875.77)
  Bottom Layer w22: v1(9809.65,5875.77) v1@9809.65,5875.91
DOUT16_LED1: LED16_LED1.2 LED17_LED1.4 | length 615.4
  Top Layer w22: LED17_LED1.4@4836.69,12305.84 v1@4899.51,12305.84 ; v1@5238.98,12016.81 LED16_LED1.2@5301.8,12016.81
  Bottom Layer w12: v1(4899.51,12305.71) 4975.87,12305.71 cw(c4975.87,12205.71) 5046.58,12276.42 5209.69,12113.31 cw(c5138.98,12042.6) 5238.98,12042.6 v1(5238.98,12016.95)
DOUT16_LED2: LED16_LED2.2 LED17_LED2.4 | length 892.9
  Top Layer w22: LED16_LED2.2@15239.4,11966.3 v1@15302.22,11966.3 ; v1@16036.51,12066.72 LED17_LED2.4@16099.33,12066.72
  Bottom Layer w12: v1(15302.22,11966.44) 15338.75,12002.97 cw(c15409.46,11932.26) 15409.46,12032.26 15960.49,12032.26 ccw(c15960.49,12132.26) 16031.2,12061.55 v1(16036.51,12066.86)
DOUT16_LED3: LED16_LED3.2 LED17_LED3.4 | length 429.6
  Top Layer w12: LED17_LED3.4@23873.61,9698.94 23878.63,9698.94 cw(c23878.63,9598.94) 23949.35,9669.65 24121.51,9497.49 ccw(c24192.22,9568.2) 24192.22,9468.2 LED16_LED3.2@24216.28,9468.2
DOUT16_LED4: LED16_LED4.2 LED17_LED4.4 | length 902
  Top Layer w22: LED17_LED4.4@26638.4,4427.36 v1@26707.22,4427.36 ; LED16_LED4.2@26644.62,3657.07 v1@26707.44,3657.07
  Bottom Layer w12: v1(26707.22,4427.5) 26707.22,3657.42 v1(26707.44,3657.2)
DOUT16_LED5: LED16_LED5.2 LED17_LED5.4 | length 486.2
  Top Layer w12: LED17_LED5.4@20188.23,9408.7 20278.88,9408.7 cw(c20278.88,9308.7) 20349.59,9379.41 20398.81,9330.19 ccw(c20469.52,9400.9) 20469.52,9300.9 LED16_LED5.2@20638.34,9300.9
DOUT16_LED6: LED16_LED6.2 LED17_LED6.4 | length 996.2
  Top Layer w22: LED16_LED6.2@16028.69,8437.3 v1@16091.51,8437.3 ; v1@16808.72,8828.22 LED17_LED6.4@16871.54,8828.22
  Bottom Layer w12: v1(16091.51,8437.17) 16421.32,8766.97 cw(c16492.03,8696.26) 16492.03,8796.26 16735.47,8796.26 ccw(c16735.47,8896.26) 16806.19,8825.55 v1(16808.72,8828.09)
DOUT16_LED7: LED16_LED7.2 LED17_LED7.4 | length 470.4
  Top Layer w12: LED17_LED7.4@12595.54,5377.22 12771.25,5377.22 ccw(c12771.25,5444.75) 12819,5397 12887.01,5465.01 cw(c12957.72,5394.3) 12957.72,5494.3 LED16_LED7.2@13024.69,5494.3
DOUT16_LED8: LED16_LED8.2 LED17_LED8.4 | length 426.7
  Top Layer w12: LED17_LED8.4@10348.54,11884.22 10362,11884.22 cw(c10368.71,11877.51) 10368.71,11887 10573.15,11887 cw(c10573.15,11853.2) 10585.5,11884.66 cw(c10573.15,11853.2) 10597.05,11877.1 ccw(c10618.59,11922.59) 10618.59,11872.26 LED16_LED8.2@10771.12,11872.26
DOUT16_LED9: LED16_LED9.2 LED17_LED9.4 | length 951.2
  Top Layer w22: v1@9512.3,6534.26 LED17_LED9.4@9575.12,6534.26 ; LED16_LED9.2@9549.98,5745.99 v1@9612.8,5745.99
  Bottom Layer w12: v1(9512.3,6534.13) 9583.51,6462.91 cw(c9512.8,6392.2) 9612.8,6392.2 v1(9612.8,5745.85)
DOUT17_LED1: LED17_LED1.2 LED18_LED1.4 | length 573.5
  Top Layer w22: LED18_LED1.4@4160.21,12412.97 v1@4223.03,12412.97 ; v1@4577.02,12175.92 LED17_LED1.2@4639.84,12175.92
  Bottom Layer w12: v1(4223.03,12413.1) 4298.55,12413.1 cw(c4298.55,12313.1) 4369.26,12383.81 v1(4577.02,12176.05)
DOUT17_LED2: LED17_LED2.2 LED18_LED2.4 | length 885.6
  Top Layer w22: LED17_LED2.2@15902.48,11936.8 v1@15965.3,11936.8 ; v1@16702.12,12013.33 LED18_LED2.4@16764.94,12013.33
  Bottom Layer w12: v1(15965.3,11936.94) 15981.33,11952.97 cw(c16052.04,11882.26) 16052.04,11982.26 16629.5,11982.26 ccw(c16629.5,12082.26) 16700.21,12011.55 v1(16702.12,12013.46)
DOUT17_LED3: LED17_LED3.2 LED18_LED3.4 | length 809
  Top Layer w22: LED17_LED3.2@23676.76,9569.02 v1@23739.58,9569.02 ; v1@23987.48,9027.89 LED18_LED3.4@24050.3,9027.89
  Bottom Layer w12: v1(23739.58,9568.89) 23739.58,9236.84 ccw(c23839.58,9236.84) 23768.87,9166.13 23886,9049 ccw(c23937.29,9100.29) 23937.29,9027.76 v1(23987.48,9027.76)
DOUT17_LED4: LED17_LED4.2 LED18_LED4.4 | length 949.2
  Top Layer w22: LED17_LED4.2@26441.55,4297.44 v1@26512.37,4297.44 ; LED18_LED4.4@26449.56,3481.88 v1@26512.38,3481.88
  Bottom Layer w12: v1(26512.38,3482.01) v1(26512.37,4297.58)
DOUT17_LED5: LED17_LED5.2 LED18_LED5.4 | length 474.2
  Top Layer w12: LED18_LED5.4@19539.31,9352.67 19643.91,9352.67 cw(c19643.91,9252.67) 19714.62,9323.38 19731,9307 ccw(c19799.13,9375.13) 19799.13,9278.78 LED17_LED5.2@19991.38,9278.78
DOUT17_LED6: LED17_LED6.2 LED18_LED6.4 | length 987.7
  Top Layer w22: LED17_LED6.2@16674.69,8698.3 v1@16737.51,8698.3 ; v1@17469.72,9032.22 LED18_LED6.4@17532.54,9032.22
  Bottom Layer w12: v1(16737.51,8698.17) 17009.32,8969.97 cw(c17080.03,8899.26) 17080.03,8999.26 17395.47,8999.26 ccw(c17395.47,9099.26) 17463.05,9025.54 ccw(c17395.47,9099.26) 17466.19,9028.55 v1(17469.72,9032.09)
  Bottom Layer w22: v1@17469.66,9032.15 v1@17469.72,9032.22
DOUT17_LED7: LED17_LED7.2 LED18_LED7.4 | length 481.6
  Top Layer w12: LED18_LED7.4@11962.54,5144.22 12105.52,5144.22 ccw(c12105.52,5242.48) 12107.09,5144.23 ccw(c12105.52,5242.48) 12175,5173 12220.01,5218.01 cw(c12290.72,5147.3) 12290.72,5247.3 LED17_LED7.2@12398.69,5247.3 LED17_LED7.2@12410,5247.3
DOUT17_LED8: LED17_LED8.2 LED18_LED8.4 | length 423.8
  Top Layer w12: LED18_LED8.4@9734.54,11731.22 9932.05,11731.22 ccw(c9932.05,11750.95) 9946,11737 9949.37,11740.37 cw(c9983,11706.74) 9983,11754.3 LED17_LED8.2@10151.69,11754.3
DOUT17_LED9: LED17_LED9.2 LED18_LED9.4 | length 952.1
  Top Layer w22: v1@9332.72,7190.22 LED18_LED9.4@9395.54,7190.22 ; LED17_LED9.2@9378.27,6404.34 v1@9441.09,6404.34
  Bottom Layer w12: v1(9332.72,7190.09) 9411.8,7111.01 cw(c9341.09,7040.3) 9441.09,7040.3 v1(9441.09,6404.21)
DOUT18_LED1: LED18_LED1.2 LED19_LED1.4 | length 1139.7
  Top Layer w22: LED18_LED1.2@3963.36,12283.05 v1@4026.18,12283.05 ; v1@4698.71,12703.19 LED19_LED1.4@4761.53,12703.19
  Bottom Layer w12: v1(4026.18,12283.18) 4026.18,12545.9 cw(c4126.18,12545.9) 4055.47,12616.61 4097.93,12659.07 ; 4097.96,12659.1 cw(c4132.18,12624.82) 4132.18,12673.26 4627.22,12673.26 ccw(c4627.22,12773.26) 4697.93,12702.55 v1(4698.71,12703.32)
DOUT18_LED2: LED18_LED2.2 LED19_LED2.4 | length 907.2
  Top Layer w22: LED18_LED2.2@16568.09,11883.41 v1@16630.91,11883.41 ; v1@17365.2,11937.99 LED19_LED2.4@17428.02,11937.99
  Bottom Layer w12: v1(16630.91,11883.54) 16696.34,11948.97 cw(c16767.06,11878.26) 16767.06,11978.26 17283.64,11978.26 cw(c17283.64,11878.26) 17354.35,11948.97 v1(17365.2,11938.12)